# Altium PCB BOARD_2LAYER.PcbDoc (part 4 of 7)
Units mil, origin at the board's own origin, x right, y up, seen from the top; angles counter-clockwise.
Board outline 9842.52 x 9842.52 mil, 2 copper layers (Top Layer, Bottom Layer), stack 34.252 mil thick; 276 components, 129 nets, 793 pads, 303 vias.
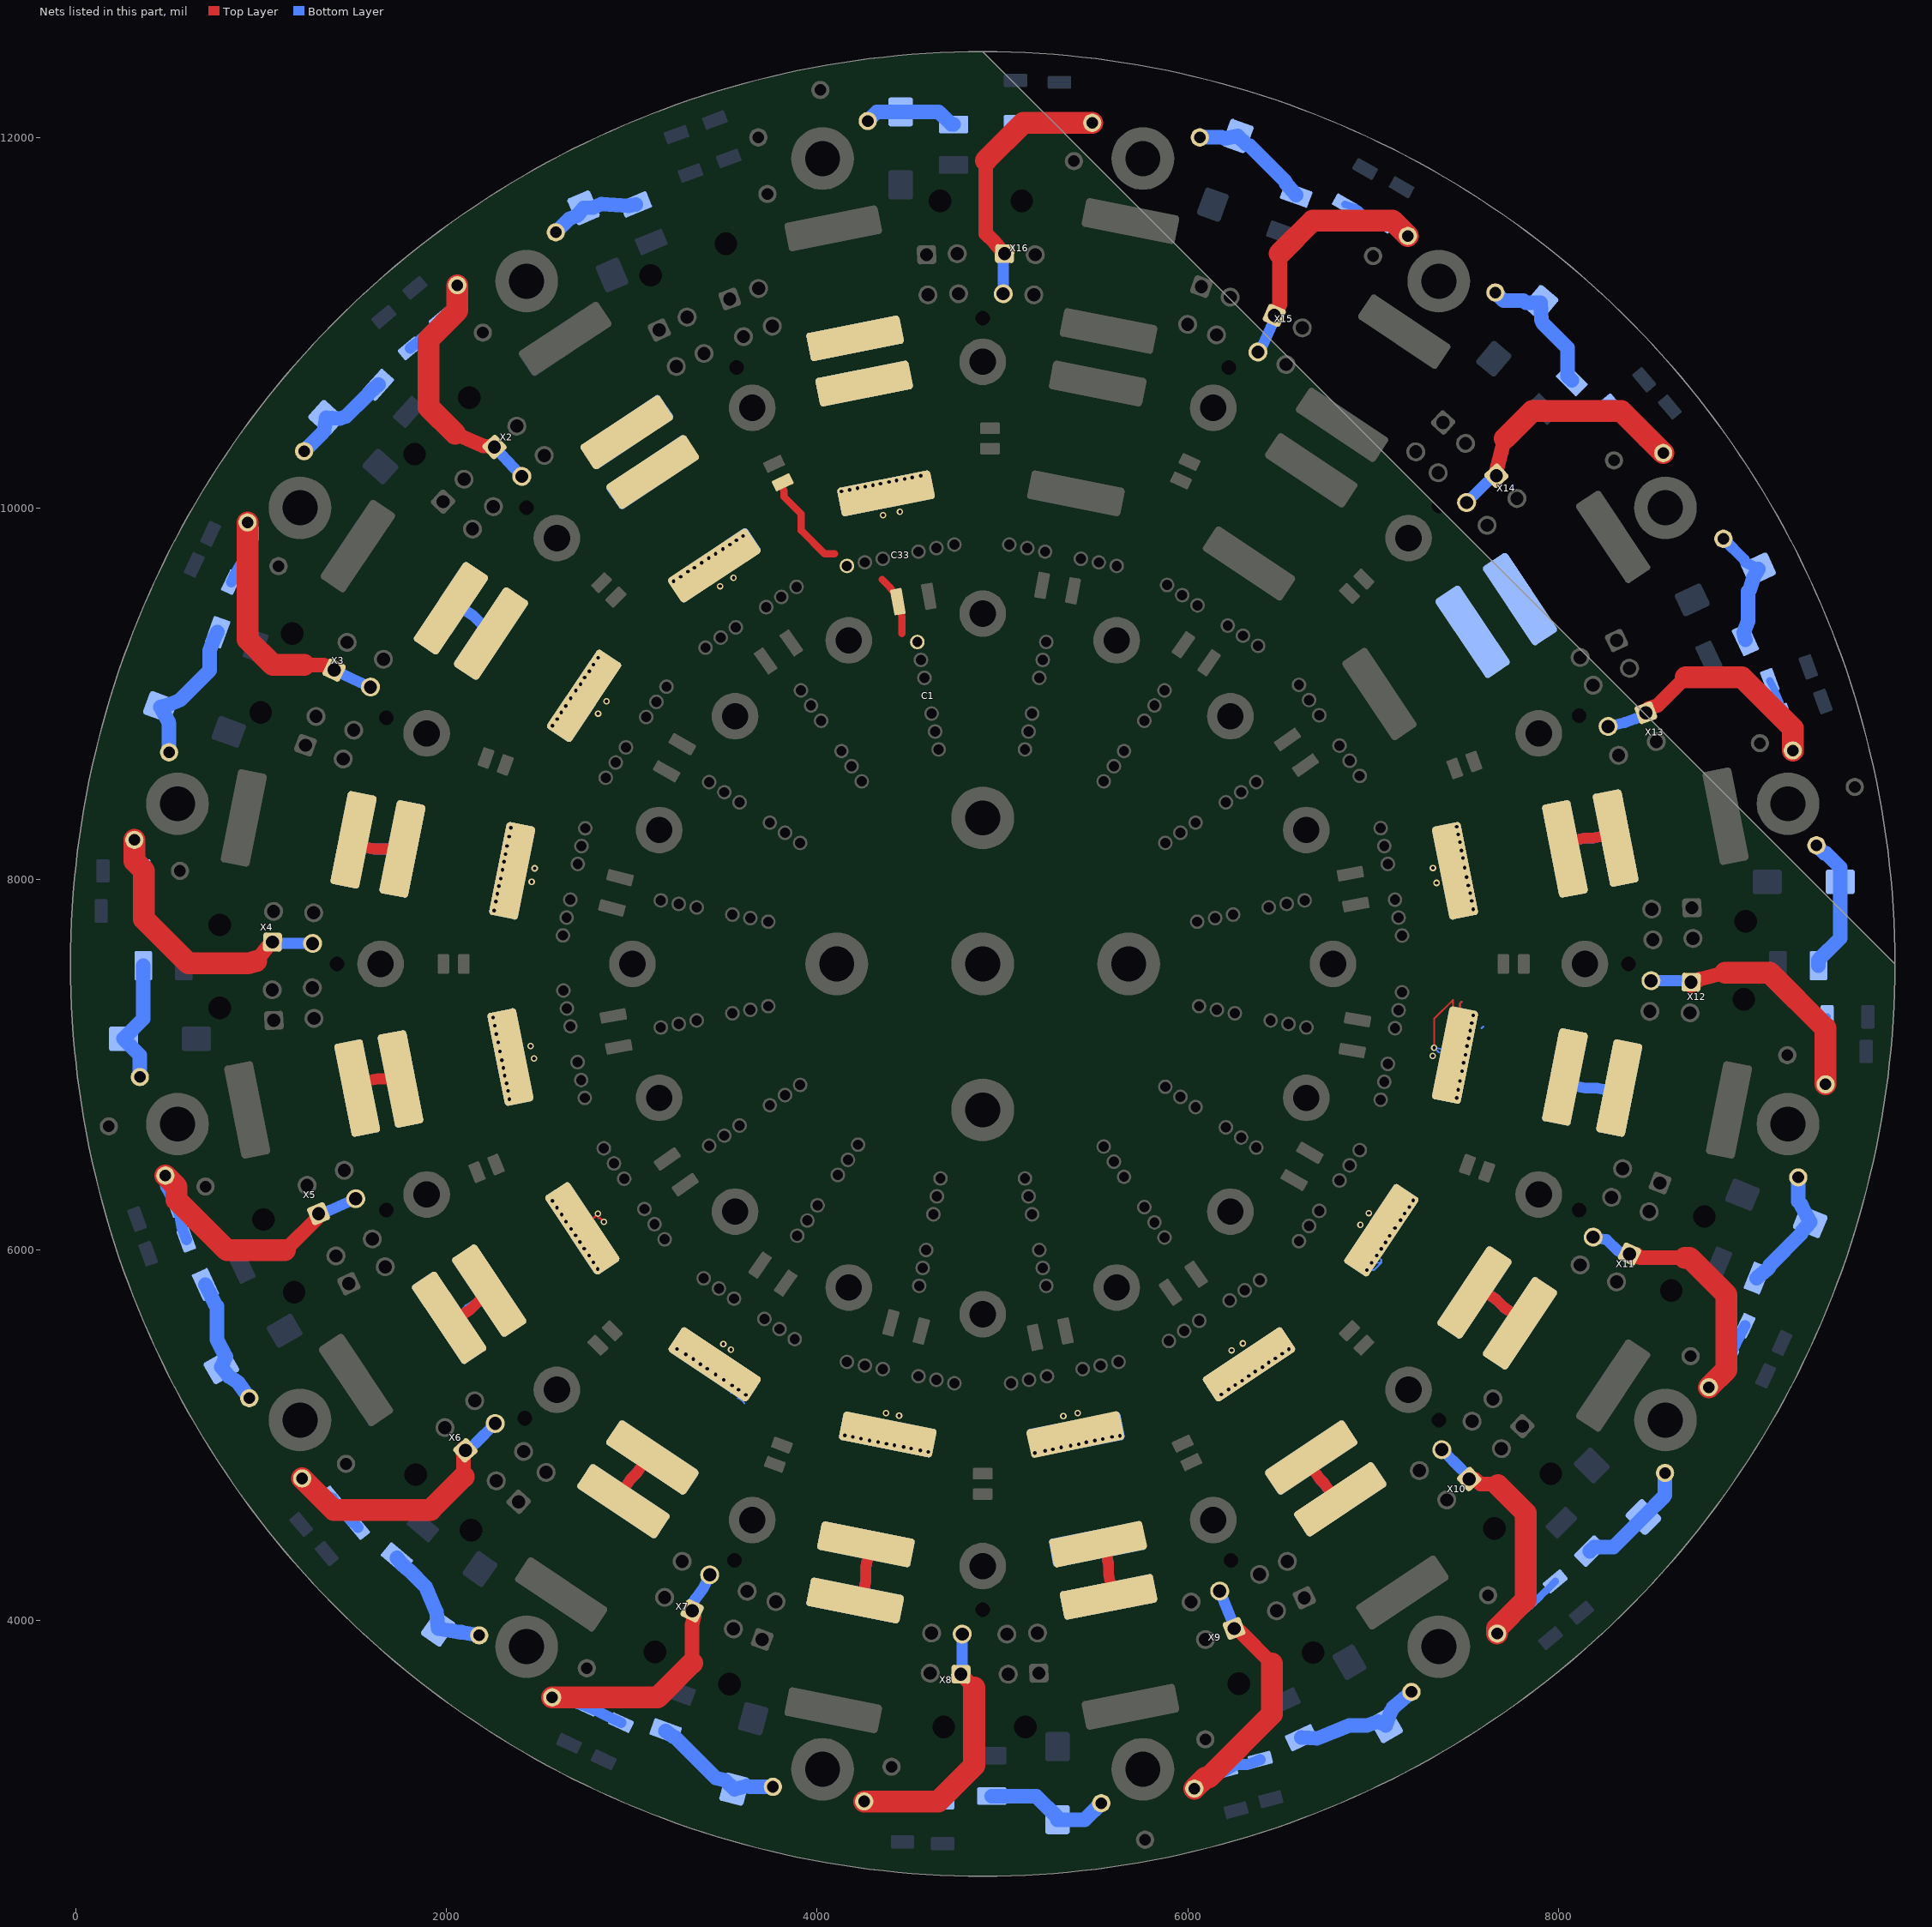
[diagram p4: the nets of this part, all layers, seen from the top]

## Free pads (board coordinates)
  round 338.58 hole 188.98 paste-99999 mask-169.29: ""(548.51,6679.13) ""(548.51,8407.48) ""(1209.93,5082.68) ""(1209.93,10003.94) ""(2432.37,3860.24) ""(2432.37,11226.38) ""(4028.83,3198.82) ""(4028.83,11887.8) ""(4105.6,7543.31) ""(4893,6755.91) ""(4893,7543.31) ""(4893,8330.71) ""(5680.4,7543.31) ""(5757.17,3198.82) ""(5757.17,11887.8) ""(7353.63,3860.24) ""(7353.63,11226.38) ""(8576.07,5082.68) ""(8576.07,10003.94) ""(9237.49,6679.13) ""(9237.49,8407.48)
  round 0 hole 78.74 unplated paste-99999 mask+0: ""(1408.75,7543.31) ""(1674.5,6214.57) ""(1674.5,8872.05) ""(2422.53,5092.52) ""(2432.37,10003.94) ""(3554.42,4324.8) ""(3564.26,10761.81) ""(4893,4059.06) ""(4893,11027.56) ""(6221.74,10761.81) ""(6231.58,4324.8) ""(7353.63,5082.68) ""(7353.63,10013.78) ""(8111.5,6214.57) ""(8111.5,8881.89) ""(8377.25,7543.31)
  round 251.97 hole 141.73 paste-99999 mask+7.87: ""(1644.97,7543.31)
  round 251.97 hole 141.73 paste-99999 mask-125.98: ""(1893,6299.21) ""(1893,8787.4) ""(2595.76,5246.06) ""(2595.76,9840.55) ""(3003.24,7543.31) ""(3146.94,6820.87) ""(3146.94,8265.75) ""(3556.39,6206.69) ""(3556.39,8879.92) ""(3648.91,4543.31) ""(3648.91,10543.31) ""(4170.56,5797.24) ""(4170.56,9289.37) ""(4893,4295.28) ""(4893,5653.54) ""(4893,9433.07) ""(4893,10791.34) ""(5615.44,5797.24) ""(5615.44,9289.37) ""(6137.09,4543.31) ""(6137.09,10543.31) ""(6229.61,6206.69) ""(6229.61,8879.92) ""(6639.06,6820.87) ""(6639.06,8265.75) ""(6782.76,7543.31) ""(7190.24,5246.06) ""(7190.24,9840.55) ""(7893,6299.21) ""(7893,8787.4) ""(8141.03,7543.31)

## Via types
v1: diameter 35.43/35.43 (per signal layer), hole 19.68, Top Layer to Bottom Layer, 303 vias

## Nets (pads, with @x,y where several pads share a name; then routed paths per layer and width w, separated by ;. In a path a pad name is that pad's centre, name@x,y a point inside that pad or via, vN(x,y) a via of type N, cw(c..) or ccw(c..) an arc to the next point about the centre after c; other vN are vias at no path point)
$1N729: L65.1 R1.2 TP18.1 | length 511.1
  Bottom Layer w78.74: TP18.1@4272.92,12090.55 4322.13,12139.76 R1.2@4450.09,12139.76 4655.8,12139.76 4723.71,12071.85 L65.1@4735.52,12071.85
$1N1831: R35.2 R36.2 TP19.1 X2.1 X2.3 | length 1821.7
  Top Layer w78.74: 2047.18,10403.25 2198.54,10337.43 X2.1@2258.7,10331.85
  Top Layer w118.11: 2047.18,10403.25 1903.33,10547.1 1903.33,10911.9 2058.35,11066.93 TP19.1@2058.35,11204.72
  Bottom Layer w59.06: R36.2@1804.41,10864.37 1830.21,10885.62 1863.06,10913.18 1918.01,10968.13 1949.9,10995.87 R35.2@1971.73,11021.85 2039.4,11084.97 2068.2,11115.6 2064.32,11148.32 TP19.1@2058.35,11204.72 ; X2.1@2258.7,10331.85 2364.08,10218.84 X2.3@2406.37,10173.49
$1N1835: L66.1 R2.2 TP20.1 | length 489.2
  Bottom Layer w78.74: TP20.1@2589.85,11490.16 2661.54,11561.85 2705.67,11580.58 R2.2@2739.31,11622.15 2790.22,11623.03 2837.61,11643.15 2981.15,11632.49 L66.1@3020.48,11640.31
$1N1894: R37.2 R38.2 TP21.1 X3.1 X3.3 | length 1744.7
  Top Layer w78.74: 1232.87,9156.45 1337.15,9156.45 1352.57,9149.26 X3.1@1393.79,9128.31
  Top Layer w118.11: TP21.1@926.46,9925.2 926.46,9293.93 1063.95,9156.45 1232.87,9156.45
  Bottom Layer w59.06: R37.2@839.36,9603.02 858.09,9639.53 856.66,9640.95 893.28,9703.71 900.47,9719.12 R38.2@927.95,9770.34 951.89,9823.21 959.08,9838.62 959.08,9892.59 TP21.1@926.46,9925.2 ; X3.1@1393.79,9128.31 1493.68,9080.81 X3.3@1590.04,9036.79
$1N1898: L67.1 R3.2 TP22.1 | length 579.7
  Bottom Layer w78.74: TP22.1@1231.58,10309.06 1327.47,10404.94 1338.85,10417.58 R3.2@1351.04,10489.99 1426.49,10485.58 1458.68,10496.88 1566.32,10604.52 1587.9,10628.49 L67.1@1632.68,10667.59
$1N1957: R39.2 R40.2 TP23.1 X4.1 X4.3 | length 1916.7
  Top Layer w78.74: 972.99,7557.76 1039.08,7640.46 X4.1@1061.44,7661.31
  Top Layer w118.11: TP23.1@316.23,8212.6 316.23,8098.43 367.73,8046.92 367.73,7785.8 607.52,7546.01 928.1,7546.01 972.99,7557.76
  Bottom Layer w59.06: TP23.1@316.23,8212.6 316.23,8124.02 367.41,8072.83 R39.2@367.41,8045.28 367.41,7966.11 357.57,7956.27 R40.2@357.57,7828.74 ; X4.1@1061.44,7661.31 1107.45,7654.35 1124.66,7653.75 X4.3@1277.84,7653.75
$1N1961: L68.1 R4.2 TP24.1 | length 809.9
  Bottom Layer w78.74: TP24.1@503.24,8685.04 503.24,8833.32 499.97,8849.35 R4.2@456.05,8929.53 502.42,8941.94 562.45,8967.09 723.27,9127.91 723.27,9234.36 746.25,9297.52 L68.1@764.75,9332.64
$1N2020: R41.2 R42.2 TP25.1 X5.1 X5.3 | length 1716.5
  Top Layer w78.74: 1129.25,5999.02 1297.86,6167.64 X5.1@1309.81,6195.78
  Top Layer w118.11: TP25.1@483.55,6401.57 543.4,6341.72 543.4,6271.06 815.44,5999.02 1129.25,5999.02
  Bottom Layer w59.06: TP25.1@483.55,6401.57 483.55,6344.73 497.42,6319.54 497.51,6319.29 R42.2@537.93,6242.43 557.58,6191.4 559.72,6194.96 571,6125.82 576.82,6109.84 R41.2@596.98,6055.42 ; X5.1@1309.81,6195.78 1354.73,6207.98 1370.5,6214.35 X5.3@1510.58,6276.89
$1N2024: L69.1 R5.2 TP26.1 | length 681.5
  Bottom Layer w78.74: TP26.1@345.76,6933.07 345.76,7051.18 R5.2@257.17,7139.76 364.46,7247.05 L69.1@364.46,7533.46
$1N2036: R43.2 R44.2 TP27.1 X6.1 X6.3 | length 1814.8
  Top Layer w78.74: 2092.27,4776.85 2092.27,4852.49 2090.67,4898.58 2092.27,4929.11 2102.11,4929.11 X6.1@2102.11,4919.26
  Top Layer w118.11: TP27.1@1221.74,4767.72 1391.09,4598.37 1913.79,4598.37 2092.27,4776.85
  Bottom Layer w59.06: TP27.1@1221.74,4767.72 1295.79,4693.66 1309.68,4693.66 1325.58,4686.76 R43.2@1384.93,4661.41 1416.68,4612.3 1428.81,4597.84 1468.99,4557.66 1480.35,4544.13 R44.2@1522.72,4503.93 ; X6.1@2102.11,4919.26 2141.8,4944.26 2155.25,4956.37 X6.3@2263.03,5064.15
$1N2039: L70.1 R6.2 TP28.1 | length 706.8
  Bottom Layer w78.74: L70.1@699.5,5814.06 732.47,5748.04 751.12,5708.05 761.45,5697.72 761.45,5516.26 809.42,5425.05 R6.2@785.51,5368.11 824.35,5318.97 872.05,5288.64 TP28.1@936.31,5200.79
$1N2051: R45.2 R46.2 TP29.1 X7.1 X7.3 | length 1740.8
  Top Layer w78.74: 3325.36,3772.42 3325.36,3979.5 3335.31,4024.55 X7.1@3325.36,4053.45
  Top Layer w118.11: TP29.1@2570.17,3586.61 3139.55,3586.61 3325.36,3772.42
  Bottom Layer w59.06: TP29.1@2570.17,3586.61 2660.04,3586.61 2683.21,3563.45 2698.62,3556.26 R45.2@2754.55,3538.88 2807.81,3515.78 2823.22,3508.6 2873.73,3482.41 2889.14,3475.22 R46.2@2941.56,3450.3 ; X7.1@3325.36,4053.45 3333.84,4100.74 3341.3,4116.03 3385.76,4176.07 X7.3@3420.28,4248.07
$1N2054: L71.1 R7.2 TP30.1 | length 684
  Bottom Layer w78.74: L71.1@1732.22,4339.54 1757.32,4308.25 1797.31,4273.52 1886.42,4184.41 1945.65,4047.89 R7.2@1955.29,3956.86 2023.97,3946.91 2077.33,3937.17 2081.25,3938.57 TP30.1@2176.46,3921.26
$1N2066: R47.2 R48.2 TP31.1 X8.1 X8.3 | length 1841.4
  Top Layer w78.74: X8.1@4775,3711.75 4846.76,3639.98
  Top Layer w118.11: TP31.1@4253.24,3025.59 4653.78,3025.59 4846.76,3218.58 4846.76,3639.98
  Bottom Layer w59.06: TP31.1@4253.24,3025.59 4384.14,3025.59 4386.11,3027.56 R47.2@4459.93,3027.56 4592.8,3027.56 4602.65,3017.72 R48.2@4676.46,3017.72 ; X8.1@4775,3711.75 4781.95,3757.75 4782.55,3774.97 X8.3@4782.55,3928.15
$1N2069: L72.1 R8.2 TP32.1 | length 703.4
  Bottom Layer w78.74: L72.1@3182.41,3405.21 3223.36,3373.96 3235.11,3369.69 3452.15,3152.64 3501.41,3139.44 R8.2@3552.68,3091.35 3621.49,3108.73 3637.92,3104.33 TP32.1@3761.11,3104.33
$1N2272: R49.2 R50.2 TP33.1 X9.1 X9.3 | length 1757.4
  Top Layer w78.74: X9.1@6249.14,3958.08 6277.07,3945.65 6453.97,3768.74
  Top Layer w118.11: TP33.1@6034.73,3094.49 6094.59,3154.34 6111.34,3154.34 6453.97,3496.98 6453.97,3768.74
  Bottom Layer w59.06: TP33.1@6034.73,3094.49 6098.23,3157.98 6134.25,3157.98 6150.67,3162.39 R49.2@6203.05,3191.13 6255.43,3219.87 6271.86,3224.27 6319.32,3224.27 6335.74,3228.67 R50.2@6390.06,3250.18 ; X9.3@6171.54,4160.23 6229.8,4018.38 6235.9,4002.5 X9.1@6249.14,3958.08
$1N2276: L73.1 R9.2 TP34.1 | length 686.8
  Bottom Layer w78.74: L73.1@4942.21,3054.13 5181.39,3054.13 5296.54,2938.98 R9.2@5296.54,2927.17 5444.18,2927.17 TP34.1@5532.76,3015.75
$1N2288: R51.2 R52.2 TP35.1 X10.1 X10.3 | length 1733.3
  Top Layer w78.74: X10.1@7517.46,4764.61 7548.01,4763.54 7579.1,4736.83 7665.71,4736.83 7669.44,4733.1 7670.77,4733.1 7673.07,4730.8
  Top Layer w118.11: TP35.1@7668.59,3931.1 7668.59,3959.23 7821.64,4112.29 7821.64,4582.23 7673.07,4730.8
  Bottom Layer w39.37: TP35.1@7668.59,3931.1 7759.45,4021.96 7773.08,4033.4 R52.2@7814.27,4074.6 7867.97,4100.88 7881,4111.81 7927.86,4158.67 7941.39,4170.02 R51.2@7981.59,4212.4
  Bottom Layer w59.06: X10.3@7369.78,4922.97 7478.1,4814.65 7489.85,4802.05 X10.1@7517.46,4764.61
$1N2291: L74.1 R10.2 TP36.1 | length 711.2
  Bottom Layer w78.74: L74.1@6612.4,3369.49 6695.91,3364.99 6870.54,3435.82 6965.8,3435.82 7024.7,3456.12 R10.2@7068.2,3435.82 7095.72,3512.09 7107.66,3531.24 TP36.1@7205.99,3616.14
$1N2303: R53.2 R54.2 TP37.1 X11.1 X11.3 | length 1777.3
  Top Layer w78.74: X11.1@8382.36,5977.99 8419.24,5977.99 8439,5958.23 8681.51,5958.23
  Top Layer w118.11: 8681.51,5958.23 8705.76,5958.23 8904.68,5759.31 8904.68,5354.2 TP37.1@8810.32,5259.84
  Bottom Layer w9.84: R54.2@8917.11,5414.7 8907.26,5414.7 R54.2@8942.15,5466.7
  Bottom Layer w39.37: TP37.1@8810.32,5259.84 8874.48,5324 8896.79,5371.84 R54.2@8907.26,5414.7
  Bottom Layer w59.06: X11.3@8186.12,6069.51 8259.22,6055.62 8320.31,5994.53 8335.72,5987.34 X11.1@8382.36,5977.99 ; R54.2@8942.15,5466.7 8971.02,5525.23 8978.21,5540.65 R53.2@9005.69,5591.86
$1N2306: L75.1 R11.2 TP38.1 | length 650.5
  Bottom Layer w78.74: L75.1@8169.07,4375.5 8191.34,4397.77 8295.54,4397.77 R11.2@8457.39,4559.62 8574.1,4676.34 TP38.1@8574.1,4797.24
$1N2318: R55.2 R56.2 TP39.1 X12.1 X12.3 | length 1773.9
  Top Layer w78.74: X12.1@8714.72,7444.99 8714.72,7425.31 8762.01,7461.32 8898.11,7496.25
  Top Layer w118.11: 8898.11,7496.25 9139.06,7496.25 9438.69,7196.61 9438.69,7009.43 9440.24,7007.87 TP39.1@9440.24,6893.7
  Bottom Layer w39.37: TP39.1@9440.24,6893.7 9440.24,7033.46 9438.28,7035.43 R55.2@9438.28,7070.87 9438.28,7159.45 9448.12,7169.29 R56.2@9448.12,7257.87
  Bottom Layer w59.06: X12.3@8498.31,7452.55 8651.49,7452.55 8668.71,7451.95 X12.1@8714.72,7444.99
$1N2321: L76.1 R12.2 TP40.1 | length 679.3
  Bottom Layer w78.74: L76.1@9069.1,5848.84 9133.24,5902.5 9139.9,5918.5 9307.07,6085.67 9313.44,6101.44 R12.2@9357.01,6150.67 9313.55,6231.66 9306.77,6248.29 9292.61,6262.46 TP40.1@9292.61,6391.73
$1N2363: R57.2 R58.2 TP41.1 X13.1 X13.3 | length 1727.1
  Top Layer w78.74: X13.1@8470.4,8898.19 8485.19,8920.75 8534.18,8938.58 8684.75,9089.15
  Top Layer w118.11: 8684.75,9089.15 8989.25,9089.15 9263.08,8815.32 TP41.1@9263.08,8694.88
  Bottom Layer w39.37: R58.2@9139.81,9070.56 9167.06,9018.73 9172.88,9002.75 9194,8954.48 9199.81,8938.49 R57.2@9218.55,8883.56 9237.28,8828.62 9243.09,8812.64 9263.08,8792.65 TP41.1@9263.08,8694.88
  Bottom Layer w59.06: X13.3@8266.92,8824.13 8356.47,8845.75 8414.83,8866 8430.81,8871.82 X13.1@8470.4,8898.19
$1N2366: L77.1 R13.2 TP42.1 | length 756.3
  Bottom Layer w78.74: TP42.1@9391.03,8183.07 9433.49,8140.62 9442.34,8140.62 9518.98,8063.98 R13.2@9518.98,7986.22 9518.98,7682.09 9401.86,7564.96 L77.1@9401.86,7533.46
$1N2368: R59.2 R60.2 TP43.1 X14.1 X14.3 | length 1808.7
  Top Layer w78.74: X14.1@7664.2,10177.19 7665.8,10207.72 7710.18,10377.77
  Top Layer w118.11: 7710.18,10377.77 7858.5,10526.08 8337.39,10526.08 TP43.1@8564.26,10299.21
  Bottom Layer w39.37: R59.2@8292.81,10553.16 8329.87,10508.5 8341.61,10494.51 8376.87,10459.25 8388.23,10445.72 R60.2@8430.6,10405.52 8487.74,10377.71 8498.02,10365.45 TP43.1@8564.26,10299.21
  Bottom Layer w59.06: X14.3@7503.28,10032.3 7611.06,10140.08 7624.51,10152.19 X14.1@7664.2,10177.19
$1N2371: L78.1 R14.2 TP44.1 | length 653.8
  Bottom Layer w59.06: TP44.1@8889.06,9836.61 9000.58,9725.1 9007.76,9709.69 R14.2@9077.31,9673.74
  Bottom Layer w78.74: L78.1@9007.76,9292.23 8998.24,9331.19 9021.5,9392.06 9021.5,9553.19 9030.84,9562.53 9053.3,9632.18 R14.2@9077.31,9673.74
$1N2373: R61.2 R62.2 TP45.1 X15.1 X15.3 | length 1754.1
  Top Layer w78.74: X15.1@6465.84,11041.98 6487.89,11082.76 6494.8,11098.3 6494.8,11374.81
  Top Layer w118.11: 6494.8,11374.81 6673.6,11553.61 7103.17,11553.61 TP45.1@7186.31,11470.47
  Bottom Layer w39.37: R62.2@6845.76,11640.75 6903.11,11624.04 6917.84,11615.54 6958.76,11574.62 6974.6,11574.62 6989.33,11566.11 R61.2@7042.61,11542.33 7095.88,11518.54 7110.61,11510.04 7146.74,11510.04 TP45.1@7186.31,11470.47
  Bottom Layer w59.06: X15.3@6377.76,10844.17 6377.76,10854.91 6404.84,10881.98 6455.58,10995.96 X15.1@6465.84,11041.98
$1N2376: L79.1 R15.2 TP46.1 | length 751.8
  Bottom Layer w78.74: TP46.1@7658.75,11165.35 7703.46,11120.64 7809.68,11120.64 7822.7,11109.7 R15.2@7903.39,11109.46 7906.33,11018.36 7913.12,11001.73 8048.38,10866.47 8048.38,10713.7 L79.1@8070.65,10691.43
$1N2378: R63.2 R64.2 TP47.1 X16.1 X16.3 | length 1836.4
  Top Layer w78.74: 4909.47,11877.76 4909.47,11483.47 4954.85,11438.09 4990.16,11397.22 X16.1@5011,11374.87
  Top Layer w118.11: 4909.47,11877.76 5112.42,12080.71 TP47.1@5483.55,12080.71
  Bottom Layer w39.37: R63.2@5070.17,12088.58 5222.72,12088.58 5232.57,12078.74 R64.2@5306.39,12078.74 5421.54,12078.74 5423.51,12080.71 TP47.1@5483.55,12080.71
  Bottom Layer w59.06: X16.3@5003.44,11158.46 5003.44,11311.64 5004.05,11328.86 X16.1@5011,11374.87
$1N2381: L80.1 R16.2 TP48.1 | length 657.8
  Bottom Layer w78.74: TP48.1@6064.26,12001.97 6182.49,12001.97 6198.48,11996.15 R16.2@6269.38,12009.78 6318.3,11963.01 6334.29,11957.19 6521.67,11769.81 6529.14,11754.91 L80.1@6583.91,11691.25
$1N2769: C1.2 C17.1 C33.2 R17.2 | length 856.7
  Top Layer w39.37: R17.2@3813.93,10140.99 3813.08,10111.32 3820.27,10095.9 3820.27,10064.28 3914.49,9970.06 3914.49,9881.14 4040.32,9755.31 4094.41,9755.31 ; 4349.45,9617.98 4393.68,9573.75 4415.15,9545.43 C17.1@4435.62,9497.11 4451.34,9447.95 4457.61,9412.39 4457.61,9326.44
$1N3213: L1.2 L2.1
$1N3215: L2.2 L3.1 | length 2310.3
  Top Layer w9.84: v1(4131.19,10092.52) 4151.37,10072.34 4159.73,10080.7 4159.73,10085.63 L3.1@4172.53,10098.43 ; v1(4174.5,10100.39) L3.1@4172.53,10098.43 ; v1(4217.8,10110.24) 4217.8,10107.81 L3.1@4244.02,10081.59 ; v1(4259.14,10118.11) 4259.14,10107.81 L3.1@4285.36,10081.59 ; v1(4300.48,10125.98) 4300.48,10107.81 L3.1@4326.7,10081.59 ; v1(4341.82,10133.86) 4341.82,10107.81 L3.1@4368.04,10081.59 ; v1(4428.43,10151.57) 4394.97,10151.57 v1(4387.09,10143.7) 4387.09,10107.81 4371.24,10091.96 L3.1@4371.24,10081.59 ; v1(4471.74,10159.45) L3.1@4471.74,10107.81 ; v1(4513.08,10167.32) L3.1@4535.01,10145.39 ; v1(4558.35,10177.17) 4562.57,10172.95 L3.1@4535.01,10145.39 ; L3.1@4573.06,10049.07 4562.29,10059.83 4562.29,10066.93 4560.32,10068.9 4560.32,10074.8 4378.03,10074.8 L3.1@4371.24,10081.59 ; L3.1@4172.53,10098.43 4189.36,10081.59 L3.1@4244.02,10081.59 ; L3.1@4244.02,10081.59 L3.1@4285.36,10081.59 ; L3.1@4285.36,10081.59 L3.1@4326.7,10081.59 ; L3.1@4316.73,10055.37 4345.02,10055.37 L3.1@4371.24,10081.59 ; L3.1@4316.73,10055.37 4316.73,10033.96 4296.54,10013.78 4276.36,10033.96 4276.36,10055.37 L3.1@4316.73,10055.37 ; L3.1@4326.7,10081.59 L3.1@4368.04,10081.59 ; L3.1@4368.04,10081.59 L3.1@4371.24,10081.59 ; L3.1@4371.24,10081.59 4397.46,10107.81 L3.1@4471.74,10107.81 ; L3.1@4471.74,10107.81 4497.43,10107.81 L3.1@4535.01,10145.39
  Bottom Layer w9.84: v1(4131.19,10092.52) 4151.37,10072.34 4159.73,10080.7 4159.73,10085.63 L2.2@4172.53,10098.43 ; v1(4174.5,10100.39) L2.2@4172.53,10098.43 ; v1(4217.8,10110.24) 4217.8,10107.81 L2.2@4244.02,10081.59 ; v1(4259.14,10118.11) 4259.14,10107.81 L2.2@4285.36,10081.59 ; v1(4300.48,10125.98) 4300.48,10107.81 L2.2@4326.7,10081.59 ; L2.2@4316.73,10055.37 4345.02,10055.37 L2.2@4371.24,10081.59 ; v1(4341.82,10133.86) 4341.82,10107.81 L2.2@4368.04,10081.59 ; v1(4428.43,10151.57) 4394.97,10151.57 v1(4387.09,10143.7) 4387.09,10107.81 4371.24,10091.96 L2.2@4371.24,10081.59 ; v1(4471.74,10159.45) L2.2@4471.74,10107.81 ; v1(4513.08,10167.32) L2.2@4535.01,10145.39 ; v1(4558.35,10177.17) 4562.57,10172.95 L2.2@4535.01,10145.39 ; L2.2@4172.53,10098.43 4189.36,10081.59 L2.2@4244.02,10081.59 ; L2.2@4244.02,10081.59 L2.2@4285.36,10081.59 ; L2.2@4285.36,10081.59 L2.2@4326.7,10081.59 ; L2.2@4326.7,10081.59 L2.2@4368.04,10081.59 ; L2.2@4368.04,10081.59 L2.2@4371.24,10081.59 ; L2.2@4371.24,10081.59 4397.46,10107.81 L2.2@4471.74,10107.81 ; L2.2@4471.74,10107.81 4497.43,10107.81 L2.2@4535.01,10145.39
  other v1: 4355.6,9964.57 4446.15,9982.28
$1N3217: L3.2 L4.1
$1N5209: L5.2 L6.1
$1N5210: L6.2 L7.1 | length 1516.3
  Top Layer w9.84: v1(3225.68,9608.27) 3225.68,9622.75 3263.08,9622.75 v1(3263.08,9631.89) 3284.73,9653.54 L7.1@3300.48,9653.54 ; L7.1@3298.51,9651.57 L7.1@3300.48,9653.54 ; v1(3302.45,9659.45) L7.1@3306.39,9659.45 ; L7.1@3333.94,9677.17 L7.1@3339.85,9677.17 ; v1(3337.88,9681.1) 3347.72,9690.94 L7.1@3353.63,9690.94 ; L7.1@3420.56,9740.16 3414.65,9734.25 v1(3414.65,9732.28) L7.1@3444.5,9762.13 ; v1(3491.42,9781.5) L7.1@3467.8,9781.5 ; v1(3528.83,9805.12) L7.1@3520.21,9805.12 ; v1(3599.69,9852.36) 3564.26,9852.36 v1(3564.26,9828.74) 3544.08,9808.56 3523.64,9808.56 L7.1@3520.21,9805.12 ; L7.1@3300.48,9653.54 L7.1@3306.39,9659.45 ; L7.1@3306.39,9659.45 3320.17,9673.23 3335.91,9673.23 L7.1@3339.85,9677.17 ; L7.1@3339.85,9677.17 L7.1@3353.63,9690.94 ; L7.1@3353.63,9690.94 3369.38,9706.69 v1(3377.25,9706.69) 3401.11,9682.83 3435.15,9682.83 L7.1@3444.5,9692.18 3444.5,9726.22 3463.12,9744.84 v1(3452.05,9755.91) 3450.73,9755.91 L7.1@3444.5,9762.13 ; L7.1@3444.5,9762.13 3448.12,9765.75 3452.05,9765.75 L7.1@3467.8,9781.5 ; L7.1@3467.8,9781.5 3491.42,9805.12 L7.1@3520.21,9805.12
  Bottom Layer w9.84: v1(3225.68,9608.27) 3239.46,9608.27 v1(3263.08,9631.89) 3291.62,9631.89 3291.62,9622.95 3376.01,9622.95 L6.2@3437.04,9683.98 ; v1(3302.45,9659.45) 3330.99,9659.45 3337.88,9666.34 v1(3337.88,9681.1) 3366.42,9681.1 3377.25,9691.93 v1(3377.25,9706.69) 3399.96,9683.98 L6.2@3437.04,9683.98 ; v1(3414.65,9732.28) L6.2@3446.7,9764.33 ; v1(3491.42,9781.5) L6.2@3467.8,9781.5 ; v1(3599.69,9852.36) 3564.26,9852.36 v1(3564.26,9828.74) 3528.83,9828.74 v1(3528.83,9805.12) 3491.42,9805.12 L6.2@3467.8,9781.5 ; L6.2@3437.04,9683.98 L6.2@3446.7,9693.64 3446.7,9730.72 3461.97,9745.99 v1(3452.05,9755.91) 3452.05,9758.98 L6.2@3446.7,9764.33 ; L6.2@3446.7,9764.33 3448.12,9765.75 3452.05,9765.75 L6.2@3467.8,9781.5
  other v1: 3475.68,9580.71 3548.51,9625.98
$1N5211: L7.2 L8.1
$1N5240: L9.2 L10.1 | length 268.5
  Bottom Layer w59.06: L9.2@2024.16,9462.05 2083.64,9462.55 2141.97,9423.57 L10.1@2240.18,9325.35
$1N5241: L10.2 L11.1 | length 826.1
  Top Layer w9.84: v1(2597.72,8864.17) 2626.27,8892.72 v1(2619.38,8899.61) ; v1(2643,8935.04) 2643,8948.82 v1(2670.56,8976.38) ; L11.1@2742.67,8989.61 2742.67,9026.69 2746.42,9030.44 2743.89,9032.97 v1(2723.71,9053.15) 2737,9066.44 2737,9080.22 L11.1@2742.67,9085.89 ; v1(2745.36,9088.58) L11.1@2742.67,9085.89 ; L11.1@2770.95,9136.35 v1(2770.95,9122.05) ; v1(2792.61,9157.48) 2792.61,9139.21 2775.44,9122.05 v1(2770.95,9122.05) ; L11.1@2742.67,9085.89 2742.67,9093.76 v1(2770.95,9122.05)
  Bottom Layer w9.84: v1(2572.13,8828.74) 2595.76,8852.36 2595.76,8864.17 2597.72,8866.14 v1(2597.72,8864.17) ; v1(2619.38,8899.61) 2648.91,8929.13 v1(2643,8935.04) ; v1(2670.56,8976.38) 2681.46,8965.48 2718.54,8965.48 L10.2@2742.67,8989.61 ; v1(2698.12,9017.72) 2726.23,8989.61 L10.2@2742.67,8989.61 ; v1(2745.36,9088.58) L10.2@2742.67,9085.89 ; L10.2@2755.87,9134.42 L10.2@2768.24,9122.05 ; L10.2@2769.09,9157.48 v1(2792.61,9157.48) L10.2@2772.42,9137.3 ; L10.2@2770.95,9136.31 v1(2770.95,9122.05) L10.2@2768.24,9122.05 ; L10.2@2742.67,8989.61 2742.67,9026.69 2746.42,9030.44 v1(2723.71,9053.15) 2737,9066.44 2737,9080.22 L10.2@2742.67,9085.89 ; L10.2@2742.67,9085.89 2742.67,9096.47 L10.2@2768.24,9122.05
  other v1: 2818.2,8893.7 2863.47,8960.63 2818.2,9194.88
$1N5242: L11.2 L12.1
$1N5271: L13.2 L14.1 | length 277.8
  Bottom Layer w59.06: L13.2@1498.41,8212.7 1541.44,8176.97 1610.25,8163.28 L14.1@1761.99,8163.28
$1N5272: L14.2 L15.1 | length 1869.5
  Top Layer w9.84: v1(2267.02,7879.92) 2267.02,7908.46 2276.86,7918.31 L15.1@2276.86,7921.26 ; v1(2274.89,7921.26) L15.1@2276.86,7921.26 ; v1(2292.61,8003.94) 2300.48,8011.81 L15.1@2300.48,8051.18 ; v1(2310.32,8094.49) 2300.48,8084.65 L15.1@2300.48,8051.18 ; v1(2318.2,8135.83) 2328.49,8135.83 2328.49,8071.6 L15.1@2354.71,8045.38 ; v1(2326.07,8179.13) L15.1@2330.01,8179.13 ; L15.1@2331.98,8198.82 2330.01,8196.85 L15.1@2330.01,8179.13 ; v1(2347.72,8277.56) 2347.72,8278.51 L15.1@2348.75,8279.53 ; L15.1@2351.66,8299.21 2348.75,8296.3 L15.1@2348.75,8279.53 ; L15.1@2358.57,8289.35 L15.1@2348.75,8279.53 ; L15.1@2276.86,7921.26 2282.76,7927.17 v1(2282.76,7962.6) 2328.49,7962.6 2354.71,7988.82 L15.1@2354.71,8045.38 ; L15.1@2300.48,8051.18 v1(2302.45,8051.18) 2326.64,8051.18 2332.44,8045.38 L15.1@2354.71,8045.38 ; L15.1@2330.01,8179.13 L15.1@2331.98,8179.13 ; L15.1@2331.98,8179.13 2349.21,8196.36 2349.21,8218.99 v1(2337.88,8230.32) 2337.88,8258.86 2348.75,8269.72 L15.1@2348.75,8279.53 ; L15.1@2331.98,8179.13 2354.61,8179.13 2354.71,8179.03 L15.1@2354.71,8045.38
  Bottom Layer w9.84: v1(2257.17,7830.71) 2285.72,7830.71 2334.93,7879.92 v1(2267.02,7879.92) ; v1(2274.89,7921.26) 2300.48,7895.67 2304.97,7895.67 2354.71,7945.41 L14.2@2354.71,7996.69 ; v1(2282.76,7962.6) L14.2@2282.76,7970.47 ; v1(2292.61,8003.94) L14.2@2290.64,8003.94 ; v1(2302.45,8051.18) 2302.45,8019.19 2290.64,8007.38 L14.2@2290.64,8003.94 ; v1(2310.32,8094.49) L14.2@2315.7,8094.49 ; v1(2318.2,8135.83) L14.2@2328.49,8135.83 ; L14.2@2322.13,8155.51 L14.2@2328.49,8161.87 ; v1(2326.07,8179.13) 2328.49,8179.13 L14.2@2328.49,8161.87 ; v1(2337.88,8230.32) L14.2@2350.05,8230.32 ; v1(2347.72,8277.56) 2349.69,8279.53 L14.2@2353.63,8279.53 ; L14.2@2351.66,8299.21 2353.63,8297.24 L14.2@2353.63,8279.53 ; L14.2@2282.76,7970.47 2328.49,7970.47 L14.2@2354.71,7996.69 ; L14.2@2282.76,7970.47 2282.76,7996.06 L14.2@2290.64,8003.94 ; L14.2@2315.7,8094.49 L14.2@2328.49,8107.28 ; L14.2@2315.7,8094.49 L14.2@2328.49,8094.49 ; L14.2@2328.49,8094.49 2328.49,8072.29 L14.2@2354.71,8046.07 ; L14.2@2328.49,8094.49 L14.2@2328.49,8107.28 ; L14.2@2328.49,8107.28 L14.2@2328.49,8135.83 ; L14.2@2328.49,8135.83 L14.2@2328.49,8161.87 ; L14.2@2350.05,8230.32 L14.2@2353.63,8279.53 ; L14.2@2350.05,8230.32 2354.71,8225.65 L14.2@2354.71,8046.07 ; L14.2@2354.71,7996.69 L14.2@2354.71,8045.38 L14.2@2354.71,8046.07
  other v1: 2459.93,7986.22 2475.68,8059.06
$1N5273: L15.2 L16.1 | length 277.8
  Top Layer w59.06: L16.1@1498.41,8212.7 1541.44,8176.97 1610.25,8163.28 L15.2@1761.99,8163.28
$1N5302: L17.2 L18.1
$1N5303: L18.2 L19.1 | length 903
  Bottom Layer w9.84: v1(2251.27,7253.94) 2279.81,7253.94 2344.87,7188.88 L18.2@2344.87,7041.23 ; v1(2261.11,7210.63) 2268.28,7217.8 L18.2@2309.12,7176.95 ; v1(2268.98,7165.35) 2297.53,7165.35 L18.2@2309.12,7176.95 ; v1(2278.83,7120.08) L18.2@2318.65,7120.08 ; v1(2288.67,7070.87) 2288.67,7041.23 2298.51,7041.23 v1(2298.51,7023.62) 2327.26,7023.62 L18.2@2330.99,7027.35 ; v1(2306.39,6982.28) 2318.65,6982.28 L18.2@2330.99,6994.63 ; v1(2314.26,6940.94) L18.2@2324.1,6940.94 ; v1(2324.1,6899.61) L18.2@2324.1,6940.94 ; v1(2331.98,6858.27) 2339.85,6858.27 v1(2339.85,6812.99) ; L18.2@2309.12,7176.95 2318.65,7167.42 L18.2@2318.65,7120.08 ; L18.2@2318.65,7120.08 2318.65,7067.45 L18.2@2344.87,7041.23 ; L18.2@2324.1,6940.94 L18.2@2330.99,6994.63 ; L18.2@2330.99,6994.63 L18.2@2330.99,7027.35 ; L18.2@2330.99,7027.35 L18.2@2344.87,7041.23
  other v1: 2471.74,7033.46 2454.02,7100.39
$1N5304: L19.2 L20.1 | length 248.3
  Top Layer w59.06: L20.1@1518.1,6873.91 1561.13,6909.65 1629.94,6923.33 L19.2@1752.15,6923.33
$1N5333: L21.2 L22.1 | length 297.6
  Bottom Layer w59.06: L21.2@2014.32,5634.41 2016.6,5634.41 2044.34,5606.67 2069.24,5631.57 2119.65,5681.98 2137.69,5693.25 2195.8,5739.48 2197.95,5740.92 L22.1@2230.34,5780.94
$1N5334: L22.2 L23.1 | length 1392.6
  Top Layer w9.84: v1(2572.13,6265.75) 2572.13,6228.35 v1(2595.76,6228.35) 2621.49,6202.61 L23.1@2621.49,6190.94 ; v1(2621.35,6190.94) L23.1@2621.49,6190.94 ; v1(2816.23,5897.64) 2792.61,5921.26 v1(2792.61,5933.07) 2792.61,5961.61 2783.75,5970.47 v1(2768.98,5970.47) 2768.98,5999.02 2760.13,6007.87 v1(2743.39,6007.87) 2719.77,6031.5 v1(2719.77,6043.31) 2696.15,6066.93 v1(2696.15,6078.74) 2732.82,6115.41 L23.1@2732.82,6116.69 ; v1(2849.69,6151.57) 2829.51,6171.76 2820.41,6171.76 2817.38,6174.79 v1(2817.38,6196.15) 2797.19,6175.97 2786.66,6168.93 L23.1@2732.82,6116.69 ; L23.1@2621.49,6190.94 2621.49,6177.02 v1(2644.97,6153.54) 2670.01,6128.5 2670.01,6116.69 v1(2672.53,6114.17) 2685.39,6127.04 2695.74,6116.69 L23.1@2732.82,6116.69
  Bottom Layer w9.84: v1(2572.13,6265.75) L22.2@2572.13,6228.35 ; v1(2595.76,6228.35) L22.2@2572.13,6228.35 ; v1(2621.35,6190.94) L22.2@2621.35,6174.22 ; v1(2644.97,6153.54) L22.2@2631.56,6140.14 ; v1(2816.23,5897.64) 2792.61,5921.26 v1(2792.61,5933.07) 2792.61,5961.61 2783.75,5970.47 v1(2768.98,5970.47) 2768.98,5999.02 2760.13,6007.87 v1(2743.39,6007.87) 2719.77,6031.5 v1(2719.77,6043.31) 2696.15,6066.93 v1(2696.15,6078.74) 2732.82,6115.41 L22.2@2732.82,6116.69 2695.74,6116.69 2685.39,6127.04 v1(2672.53,6114.17) 2652.34,6134.36 2637.35,6134.36 L22.2@2631.56,6140.14 ; L22.2@2572.13,6228.35 2572.13,6223.43 L22.2@2621.35,6174.22 ; L22.2@2621.35,6174.22 2631.56,6164 L22.2@2631.56,6140.14
$1N5335: L23.2 L24.1 | length 270.4
  Top Layer w59.06: L24.1@2014.32,5634.41 2069.85,5639.81 2128.18,5678.79 2229.2,5779.8 L23.2@2230.34,5780.94
$1N5364: L25.2 L26.1 | length 299.5
  Bottom Layer w59.06: L25.2@2954.57,4644.94 2954.08,4704.42 2993.05,4762.75 3024.92,4794.62 3063.9,4852.95 L26.1@3110.95,4880.65
$1N5365: L26.2 L27.1 | length 2018.6
  Top Layer w9.84: L27.1@3214.7,5487.61 3222.32,5487.61 v1(3243.39,5466.54) L27.1@3243.39,5430.38 ; L27.1@3313.87,5393.31 v1(3331.98,5411.42) 3360.26,5383.13 L27.1@3383.88,5383.13 ; v1(3369.38,5383.86) 3383.16,5383.86 L27.1@3383.88,5383.13 ; v1(3452.05,5328.74) 3458.03,5334.72 L27.1@3458.03,5336.54 ; v1(3576.07,5246.06) 3547.53,5246.06 3547.53,5282.3 L27.1@3547.11,5282.73 ; v1(3615.44,5218.5) 3615.44,5247.05 3627.26,5247.05 3634.79,5239.52 3687.37,5292.1 3687.37,5292.9 3688.55,5294.09 3688.55,5295.29 3689.48,5296.22 3689.48,5297.76 3690.16,5298.44 3690.16,5300.31 3690.55,5300.71 3690.55,5301.37 3690.11,5301.81 3690.11,5303.75 3689.38,5304.48 3689.38,5306.05 3688.38,5307.06 3688.38,5308.25 3687.11,5309.51 3687.11,5310.3 3686.42,5310.99 3686.27,5310.99 3684.82,5312.44 3554.47,5312.44 3483.78,5383.13 L27.1@3446.7,5383.13 ; L27.1@3383.88,5383.13 v1(3406.78,5360.24) 3419.65,5373.1 3436.67,5373.1 L27.1@3446.7,5383.13 ; L27.1@3446.7,5383.13 3446.7,5347.87 L27.1@3458.03,5336.54 ; L27.1@3458.03,5336.54 v1(3495.36,5299.21) 3530.62,5299.21 L27.1@3531.85,5297.98 ; L27.1@3531.85,5297.98 L27.1@3547.11,5282.73 ; L27.1@3531.85,5297.98 3531.85,5278.47 v1(3540.64,5269.69) 3540.64,5276.26 L27.1@3547.11,5282.73
  Bottom Layer w9.84: v1(3243.39,5466.54) 3263.58,5446.35 3270.97,5446.35 L26.2@3290.64,5426.68 ; v1(3290.64,5437.01) L26.2@3290.64,5426.68 ; v1(3369.38,5383.86) 3383.16,5383.86 L26.2@3383.88,5383.13 ; v1(3452.05,5328.74) 3458.03,5334.72 L26.2@3458.03,5336.54 ; 3534.73,5228.35 L26.2@3543.59,5237.2 ; 3572.13,5200.79 3574.1,5200.79 L26.2@3577.05,5203.74 ; v1(3576.07,5246.06) L26.2@3552.45,5246.06 ; 3607.57,5173.23 L26.2@3577.05,5203.74 ; v1(3615.44,5218.5) 3615.44,5247.05 3627.26,5247.05 3634.79,5239.52 3687.37,5292.1 3687.37,5292.9 3688.55,5294.09 3688.55,5295.29 3689.48,5296.22 3689.48,5297.76 3690.16,5298.44 3690.16,5300.31 3690.55,5300.71 3690.55,5301.37 3690.11,5301.81 3690.11,5303.75 3689.38,5304.48 3689.38,5306.05 3688.38,5307.06 3688.38,5308.25 3687.11,5309.51 3687.11,5310.3 3686.42,5310.99 3686.27,5310.99 3684.82,5312.44 3554.47,5312.44 3483.78,5383.13 L26.2@3446.7,5383.13 ; L26.2@3290.64,5426.68 3290.64,5416.9 3303.43,5404.1 3310.75,5411.42 v1(3331.98,5411.42) 3360.26,5383.13 L26.2@3383.88,5383.13 ; L26.2@3383.88,5383.13 v1(3406.78,5360.24) 3419.65,5373.1 3436.67,5373.1 L26.2@3446.7,5383.13 ; L26.2@3446.7,5383.13 3446.7,5347.87 L26.2@3458.03,5336.54 ; L26.2@3458.03,5336.54 v1(3495.36,5299.21) 3511.11,5299.21 v1(3540.64,5269.69) 3540.64,5257.87 L26.2@3552.45,5246.06 ; L26.2@3543.59,5237.2 L26.2@3577.05,5203.74 ; L26.2@3543.59,5237.2 L26.2@3552.45,5246.06
  other v1: 3534.73,5462.6 3493.39,5492.13
$1N5366: L27.2 L28.1 | length 299.5
  Top Layer w59.06: L28.1@2954.57,4644.94 2954.08,4704.42 2993.05,4762.75 3024.92,4794.62 3063.9,4852.95 L27.2@3110.95,4880.65
$1N5395: L29.2 L30.1 | length 327.7
  Bottom Layer w59.06: L29.2@4203.92,4109.35 4249.5,4150.42 4263.18,4219.23 4263.18,4290.63 4276.87,4359.44 L30.1@4263.18,4412.3
$1N5396: L30.2 L31.1 | length 1698.8
  Top Layer w9.84: v1(4148.91,5000) 4153.93,5005.02 L31.1@4163.36,5005.02 ; L31.1@4159.57,4988.34 4163.36,4992.13 L31.1@4163.36,5005.02 ; v1(4235.52,4982.28) L31.1@4235.52,4988.34 ; v1(4282.76,4972.44) L31.1@4282.76,4988.34 ; v1(4328.04,4964.57) L31.1@4328.04,4988.34 ; v1(4373.31,4954.72) L31.1@4381.08,4954.72 ; L31.1@4381.08,5005.02 L31.1@4408.32,5005.02 ; v1(4416.62,4946.85) 4388.96,4946.85 L31.1@4381.08,4954.72 ; v1(4465.83,4937.01) 4465.83,4978.8 L31.1@4439.61,5005.02 ; v1(4507.17,4929.13) L31.1@4532.06,4954.02 ; v1(4556.39,4919.29) L31.1@4561.58,4924.49 ; v1(4599.69,4911.42) 4586.62,4924.49 L31.1@4561.58,4924.49 ; L31.1@4163.36,5005.02 4179.32,5005.02 v1(4192.21,4992.13) 4231.73,4992.13 L31.1@4235.52,4988.34 ; L31.1@4235.52,4988.34 L31.1@4282.76,4988.34 ; L31.1@4282.76,4988.34 L31.1@4328.04,4988.34 ; L31.1@4328.04,4988.34 L31.1@4381.08,4988.34 ; L31.1@4381.08,4954.72 L31.1@4381.08,4988.34 ; L31.1@4381.08,4988.34 4391.64,4988.34 L31.1@4408.32,5005.02 ; L31.1@4408.32,5005.02 L31.1@4439.61,5005.02 ; L31.1@4439.61,5005.02 4481.05,5005.02 L31.1@4532.06,4954.02 ; L31.1@4532.06,4954.02 L31.1@4561.58,4924.49
  Bottom Layer w9.84: v1(4148.91,5000) 4153.93,5005.02 L30.2@4189.23,5005.02 ; L30.2@4186.69,5002.48 L30.2@4189.23,5005.02 ; v1(4192.21,4992.13) L30.2@4192.21,5005.02 ; v1(4235.52,4982.28) L30.2@4235.52,5005.02 ; v1(4282.76,4972.44) 4282.76,4978.8 L30.2@4328.04,4978.8 ; v1(4328.04,4964.57) L30.2@4328.04,4978.8 ; v1(4416.62,4946.85) 4381.19,4946.85 v1(4373.31,4954.72) 4373.31,4978.8 4381.08,4986.57 L30.2@4381.08,5005.02 ; v1(4465.83,4937.01) 4465.83,4978.8 L30.2@4439.61,5005.02 ; L30.2@4500.05,4966.88 L30.2@4507.17,4966.88 ; v1(4507.17,4929.13) L30.2@4507.17,4966.88 ; v1(4556.39,4919.29) L30.2@4561.58,4924.49 ; v1(4599.69,4911.42) 4586.62,4924.49 L30.2@4561.58,4924.49 ; L30.2@4189.23,5005.02 L30.2@4192.21,5005.02 ; L30.2@4192.21,5005.02 L30.2@4235.52,5005.02 ; L30.2@4235.52,5005.02 L30.2@4381.08,5005.02 ; L30.2@4328.04,4978.8 4354.86,4978.8 L30.2@4381.08,5005.02 ; L30.2@4381.08,5005.02 L30.2@4439.61,5005.02 ; L30.2@4439.61,5005.02 4465.83,5005.02 L30.2@4507.17,4978.9 ; L30.2@4507.17,4966.88 L30.2@4507.17,4978.9 ; L30.2@4507.17,4978.9 L30.2@4561.58,4924.49
  other v1: 4442.21,5106.3 4371.35,5120.08
$1N5397: L31.2 L32.1 | length 327.7
  Top Layer w59.06: L32.1@4203.92,4109.35 4249.5,4150.42 4263.18,4219.23 4263.18,4290.63 4276.87,4359.44 L31.2@4263.18,4412.3
$1N5426: L33.2 L34.1 | length 131.5
  Bottom Layer w59.06: L34.1@5512.97,4412.3 5558.55,4371.23 5572.24,4302.42
$1N5427: L34.2 L35.1 | length 2297.5
  Top Layer w9.84: v1(5174.5,4905.51) 5174.5,4934.06 5244.94,5004.49 L35.1@5385.68,5004.49 ; v1(5229.61,4917.32) 5218.97,4927.97 5257.84,4966.85 5270.95,4953.74 v1(5270.95,4925.2) ; v1(5367.41,4944.88) 5375.28,4952.76 v1(5410.72,4952.76) 5410.72,4986.27 L35.1@5392.49,5004.49 ; v1(5452.05,4962.6) 5452.05,4980.43 L35.1@5427.99,5004.49 ; v1(5497.33,4972.44) 5497.33,4980.43 L35.1@5473.27,5004.49 ; v1(5540.64,4980.31) L35.1@5540.64,5004.49 ; v1(5589.85,4992.13) L35.1@5589.85,4998.03 ; v1(5633.16,4998.03) L35.1@5589.85,4998.03 ; L35.1@5336.41,4980.43 5296.04,4980.43 5296.04,4955.22 v1(5316.23,4935.04) 5336.41,4955.22 L35.1@5336.41,4980.43 ; L35.1@5336.41,4980.43 L35.1@5361.62,4980.43 ; L35.1@5361.62,4980.43 L35.1@5385.68,5004.49 ; L35.1@5361.62,4980.43 5368.43,4980.43 L35.1@5392.49,5004.49 ; L35.1@5385.68,5004.49 L35.1@5392.49,5004.49 ; L35.1@5392.49,5004.49 L35.1@5427.99,5004.49 ; L35.1@5427.99,5004.49 L35.1@5473.27,5004.49 ; L35.1@5473.27,5004.49 L35.1@5540.64,5004.49 ; L35.1@5540.64,5004.49 L35.1@5589.85,4998.03
  Bottom Layer w9.84: v1(5174.5,4905.51) 5174.5,4934.06 5245.46,5005.02 L34.2@5386.21,5005.02 ; v1(5229.61,4917.32) 5218.51,4928.43 5257.39,4967.3 5270.95,4953.74 v1(5270.95,4925.2) ; v1(5367.41,4944.88) 5375.28,4952.76 v1(5410.72,4952.76) 5410.72,4989.38 L34.2@5395.07,5005.02 ; v1(5452.05,4962.6) 5452.05,4978.8 L34.2@5425.83,5005.02 ; v1(5497.33,4972.44) 5497.33,4978.8 L34.2@5471.11,5005.02 ; L34.2@5532.76,4968.5 5532.76,4988.19 L34.2@5540.64,4996.06 ; v1(5540.64,4980.31) L34.2@5540.64,4996.06 ; L34.2@5574.1,4978.35 5580.01,4984.25 L34.2@5589.85,4984.25 ; v1(5589.85,4992.13) L34.2@5589.85,4984.25 ; v1(5633.16,4998.03) 5604.61,4998.03 5590.83,4984.25 L34.2@5589.85,4984.25 ; L34.2@5336.41,4978.8 5336.41,4955.22 v1(5316.23,4935.04) 5296.04,4955.22 5296.04,4978.8 L34.2@5336.41,4978.8 ; L34.2@5336.41,4978.8 L34.2@5359.99,4978.8 ; L34.2@5359.99,4978.8 5368.85,4978.8 L34.2@5395.07,5005.02 ; L34.2@5359.99,4978.8 L34.2@5386.21,5005.02 ; L34.2@5386.21,5005.02 L34.2@5395.07,5005.02 ; L34.2@5395.07,5005.02 L34.2@5425.83,5005.02 ; L34.2@5425.83,5005.02 L34.2@5471.11,5005.02 ; L34.2@5471.11,5005.02 L34.2@5544.57,5005.02 ; L34.2@5540.64,4996.06 5544.57,5000 L34.2@5544.57,5005.02 ; L34.2@5544.57,5005.02 5569.08,5005.02 L34.2@5589.85,4984.25
  other v1: 5328.04,5104.33 5404.81,5120.08
$1N5428: L35.2 L36.1 | length 306.2
  Top Layer w59.06: L35.2@5515.56,4412.83 5557.95,4371.42 5572.24,4302.73 5572.24,4250.71 5585.93,4181.9 L36.1@5572.24,4129.04
$1N5457: L37.2 L38.1 | length 287.4
  Bottom Layer w59.06: L38.1@6665.2,4880.65 6670.61,4825.12 6709.58,4766.78 6735.55,4740.82 6774.53,4682.48 L37.2@6821.58,4654.78
$1N5458: L38.2 L39.1 | length 1475.1
  Top Layer w9.84: v1(6180.4,5220.47) L39.1@6219.77,5220.47 ; v1(6402.84,5368.11) 6377.18,5393.77 6340.1,5393.77 L39.1@6329.46,5383.13 ; L39.1@6219.77,5220.47 L39.1@6219.77,5221.35 ; L39.1@6219.77,5220.47 6219.48,5220.91 L39.1@6219.77,5221.35 ; L39.1@6219.77,5221.35 L39.1@6237.86,5248.03 ; L39.1@6219.77,5221.35 v1(6219.77,5248.03) L39.1@6237.86,5248.03 ; L39.1@6237.86,5248.03 L39.1@6329.46,5383.13 ; L39.1@6237.86,5248.03 6255.2,5248.03 v1(6255.2,5271.65) 6292.61,5271.65 v1(6292.61,5295.28) 6302.45,5295.28 v1(6328.04,5320.87) 6316.16,5332.75 6329.46,5346.05 L39.1@6329.46,5383.13
  Bottom Layer w9.84: v1(6180.4,5220.47) L38.2@6219.77,5220.47 ; v1(6363.47,5344.49) 6334.93,5344.49 6333.37,5346.05 L38.2@6329.46,5346.05 ; v1(6402.84,5368.11) 6402.84,5383.13 6413.41,5393.7 v1(6436.31,5393.7) 6436.31,5408.46 6443.2,5415.35 v1(6471.74,5415.35) ; L38.2@6509.14,5431.1 v1(6509.14,5440.94) 6509.14,5454.72 6401.05,5454.72 L38.2@6329.46,5383.13 ; L38.2@6544.57,5454.72 v1(6544.57,5464.57) ; L38.2@6219.77,5220.47 6219.48,5220.91 L38.2@6219.77,5221.35 ; L38.2@6219.77,5220.47 L38.2@6219.77,5221.35 ; L38.2@6219.77,5221.35 v1(6219.77,5248.03) L38.2@6237.86,5248.03 ; L38.2@6219.77,5221.35 L38.2@6237.86,5248.03 ; L38.2@6237.86,5248.03 6255.2,5248.03 v1(6255.2,5271.65) 6292.61,5271.65 v1(6292.61,5295.28) 6317.21,5295.28 6328.04,5306.1 v1(6328.04,5320.87) 6328.04,5344.63 L38.2@6329.46,5346.05 ; L38.2@6237.86,5248.03 L38.2@6329.46,5383.13 ; L38.2@6329.46,5346.05 L38.2@6329.46,5383.13
  other v1: 6235.52,5458.66 6296.54,5496.06
$1N5459: L39.2 L40.1 | length 287.4
  Top Layer w59.06: L39.2@6665.2,4880.65 6670.61,4825.12 6709.58,4766.78 6735.55,4740.82 6774.53,4682.48 L40.1@6821.58,4654.78
$1N5488: L41.2 L42.1 | length 313.4
  Bottom Layer w59.06: L42.1@7545.82,5771.1 7605.29,5771.6 7663.62,5732.62 7705.33,5690.91 7763.67,5651.94 L41.2@7791.36,5604.88
$1N5489: L42.2 L43.1 | length 1530.3
  Top Layer w9.84: v1(6965.83,5891.73) 6992.8,5918.7 L43.1@6992.8,5932.42 ; v1(6991.42,5931.1) 6992.77,5932.45 6998.8,5938.48 6998.8,5950.29 v1(7018.98,5970.47) 7043.33,5994.82 L43.1@7043.33,6018.44 ; v1(7042.61,6005.91) 7042.61,6017.72 L43.1@7043.33,6018.44 ; v1(7087.88,6076.77) 7087.88,6105.31 7083.38,6109.82 L43.1@7046.3,6109.82 ; v1(7117.41,6118.11) 7104.54,6130.98 L43.1@7067.46,6130.98 ; v1(7146.94,6161.42) 7140.96,6167.39 7103.88,6167.39 L43.1@7067.46,6130.98 ; v1(7194.18,6232.28) 7192.21,6232.28 L43.1@7186.31,6238.19 ; v1(7215.83,6267.72) L43.1@7186.31,6238.19 ; L43.1@7043.33,6018.44 v1(7066.23,6041.34) 7046.04,6061.52 7040.57,6067 7043.33,6069.77 L43.1@7043.33,6106.85 L43.1@7046.3,6109.82 ; L43.1@7046.3,6109.82 L43.1@7067.46,6130.98 ; L43.1@7144.06,6195.94 L43.1@7156.78,6208.66 ; L43.1@7144.06,6195.94 7132.42,6195.94 7145.14,6208.66 L43.1@7156.78,6208.66 ; L43.1@7144.06,6195.94 7167.68,6195.94 v1(7168.59,6196.85) L43.1@7156.78,6208.66 ; L43.1@7156.78,6208.66 L43.1@7186.31,6238.19
  Bottom Layer w9.84: v1(6965.83,5891.73) 7003.96,5891.73 7043.33,5931.1 ; v1(6991.42,5931.1) 7043.33,5931.1 ; v1(7042.61,6005.91) 7042.61,6017.72 L42.2@7043.33,6018.44 ; v1(7087.88,6076.77) 7087.88,6105.31 7083.38,6109.82 L42.2@7046.3,6109.82 ; L42.2@7182.37,6202.76 L42.2@7172.53,6212.6 ; v1(7194.18,6232.28) L42.2@7192.21,6232.28 ; L42.2@7207.96,6236.22 7205.99,6234.25 L42.2@7194.18,6234.25 ; v1(7215.83,6267.72) L42.2@7215.83,6255.91 ; L42.2@7233.55,6273.62 L42.2@7215.83,6255.91 ; 7043.33,5931.1 7043.33,5946.12 v1(7018.98,5970.47) 7043.33,5994.82 L42.2@7043.33,6018.44 ; L42.2@7043.33,6018.44 v1(7066.23,6041.34) 7040.57,6067 7043.33,6069.77 L42.2@7043.33,6106.85 L42.2@7046.3,6109.82 ; L42.2@7046.3,6109.82 7067.46,6130.98 7104.54,6130.98 v1(7117.41,6118.11) 7117.41,6131.89 v1(7146.94,6161.42) 7152.84,6161.42 7158.75,6167.32 7149.82,6176.25 7168.59,6195.02 v1(7168.59,6196.85) 7168.59,6208.66 L42.2@7172.53,6212.6 ; L42.2@7172.53,6212.6 L42.2@7192.21,6232.28 ; L42.2@7192.21,6232.28 L42.2@7194.18,6234.25 ; L42.2@7194.18,6234.25 L42.2@7215.83,6255.91
  other v1: 6930.4,6135.83 6975.68,6198.82
$1N5490: L43.2 L44.1 | length 313.4
  Top Layer w59.06: L43.2@7545.82,5771.1 7605.29,5771.6 7663.62,5732.62 7705.33,5690.91 7763.67,5651.94 L44.1@7791.36,5604.88
$1N5519: L45.2 L46.1 | length 317.8
  Bottom Layer w59.06: L46.1@8033.85,6933.18 8074.92,6887.6 8143.73,6873.91 8205.29,6873.91 8274.1,6860.22 L45.2@8326.96,6873.91
$1N5520: L46.2 L47.1 | length 3320.8
  Top Layer w9.84: v1(7328.23,7091.33) 7328.23,7247 7429.11,7347.89 7429.81,7309 L47.1@7431.71,7265.75 ; v1(7450.09,6820.87) 7441.13,6820.87 7441.13,6864.17 v1(7457.96,6864.17) 7467.8,6874.02 v1(7467.8,6911.42) 7467.35,6911.42 L47.1@7467.35,6964.57 ; 7475.68,7338.58 7468.31,7331.21 7468.31,7301.53 7464.42,7297.65 7464.42,7279.72 L47.1@7478.39,7265.75 ; v1(7479.61,6964.57) L47.1@7467.35,6964.57 ; v1(7487.49,7009.84) 7497.33,7019.69 v1(7497.33,7053.15) ; v1(7505.2,7100.39) 7505.2,7061.02 v1(7497.33,7053.15) ; v1(7515.05,7141.73) 7467.35,7141.73 L47.1@7441.13,7115.51 ; v1(7522.92,7183.07) L47.1@7498.04,7207.95 ; v1(7530.8,7224.41) 7522.64,7232.56 L47.1@7498.04,7207.95 ; v1(7538.67,7265.75) L47.1@7478.39,7265.75 ; L47.1@7431.71,7265.75 7461.15,7265.75 L47.1@7469.77,7257.13 ; L47.1@7431.71,7265.75 7431.71,7060.5 L47.1@7441.13,7051.08 ; L47.1@7441.13,7051.08 7467.35,7024.85 L47.1@7467.35,6964.57 ; L47.1@7441.13,7051.08 7443.2,7053.15 v1(7497.33,7053.15) ; L47.1@7441.13,7051.08 L47.1@7441.13,7115.51 ; L47.1@7441.13,7115.51 7441.13,7151.04 L47.1@7498.04,7207.95 ; L47.1@7469.77,7257.13 7469.77,7236.22 L47.1@7498.04,7207.95 ; L47.1@7469.77,7257.13 L47.1@7478.39,7265.75
  Bottom Layer w9.84: v1(7450.09,6820.87) 7441.13,6820.87 7441.13,6864.17 v1(7457.96,6864.17) 7467.8,6874.02 v1(7467.8,6911.42) 7467.35,6911.42 L46.2@7467.35,6964.57 ; 7475.68,7338.58 7468.31,7331.21 7468.31,7301.53 7464.42,7297.65 L46.2@7464.42,7255.78 ; v1(7479.61,6964.57) L46.2@7467.35,6964.57 ; v1(7487.49,7009.84) 7497.33,7019.69 v1(7497.33,7053.15) ; v1(7505.2,7100.39) 7505.2,7061.02 v1(7497.33,7053.15) ; v1(7515.05,7141.73) L46.2@7518.98,7137.8 ; v1(7522.92,7183.07) 7541.71,7183.07 7542.07,7182.7 7529.81,7159.46 L46.2@7518.98,7137.8 ; v1(7538.67,7265.75) 7496.5,7265.75 L46.2@7486.53,7255.78 ; L46.2@7544.44,7212.22 7532.25,7224.41 v1(7530.8,7224.41) 7522.92,7224.41 7491.55,7255.78 L46.2@7486.53,7255.78 ; 7582.81,7197.24 7585.16,7197.24 7593.4,7205.47 ; L46.2@7431.09,7267.72 7431.09,7157.31 L46.2@7436.82,7151.58 ; L46.2@7431.09,7267.72 7431.09,7278.25 7431.39,7278.54 L46.2@7431.85,7267.72 ; L46.2@7431.09,7267.72 L46.2@7431.85,7267.72 ; L46.2@7431.85,7267.72 L46.2@7436.82,7151.58 ; L46.2@7431.85,7267.72 7441.13,7267.72 L46.2@7441.13,7265.75 ; L46.2@7436.82,7151.58 7441.13,7155.89 L46.2@7441.13,7265.75 ; L46.2@7436.82,7151.58 7436.82,7055.38 L46.2@7441.13,7051.08 ; L46.2@7441.13,7051.08 7441.13,7111.57 7467.35,7137.8 L46.2@7518.98,7137.8 ; L46.2@7441.13,7051.08 7443.2,7053.15 v1(7497.33,7053.15) ; L46.2@7441.13,7051.08 7467.35,7024.85 L46.2@7467.35,6964.57 ; L46.2@7441.13,7051.08 7368.55,7064.37 7351.87,7067.69 v1(7328.23,7091.33) 7372.17,7082.59 L46.2@7441.13,7051.08 ; L46.2@7441.13,7265.75 7446.84,7265.75 7456.81,7255.78 L46.2@7464.42,7255.78 ; L46.2@7464.42,7255.78 L46.2@7486.53,7255.78
  other v1: 7320.17,7047.24
$1N5521: L47.2 L48.1
$1N5550: L49.2 L50.1 | length 298.1
  Bottom Layer w59.06: L50.1@8033.85,8163.28 8074.92,8208.86 8143.73,8222.55 8185.6,8222.55 8254.41,8236.23 L49.2@8307.27,8222.55
$1N5551: L50.2 L51.1 | length 1977.2
  Top Layer w9.84: v1(7467.8,8200.79) 7467.35,8200.79 7441.13,8174.57 L51.1@7441.13,8129.29 ; v1(7475.68,8155.51) 7467.35,8155.51 L51.1@7441.13,8129.29 ; v1(7483.55,8114.17) 7467.35,8114.17 L51.1@7441.13,8087.95 ; v1(7503.24,8011.81) 7503.24,8053.15 v1(7493.39,8062.99) 7458.74,8062.99 L51.1@7441.13,8045.38 ; v1(7513.08,7966.54) L51.1@7467.35,7966.54 ; v1(7522.92,7925.2) 7494.38,7925.2 L51.1@7477.86,7908.68 ; v1(7530.8,7883.86) 7516.74,7869.8 L51.1@7477.86,7908.68 ; v1(7538.67,7838.58) 7525.69,7838.58 7441.13,7923.14 L51.1@7441.13,8045.38 ; L51.1@7441.13,8045.38 7467.35,8019.16 L51.1@7467.35,7966.54 ; L51.1@7441.13,8045.38 L51.1@7441.13,8087.95 ; L51.1@7441.13,8087.95 L51.1@7441.13,8129.29 ; L51.1@7467.35,7966.54 7467.35,7919.19 L51.1@7477.86,7908.68
  Bottom Layer w9.84: v1(7450.09,8283.46) 7450.09,8242.13 v1(7457.96,8242.13) ; v1(7467.8,8200.79) 7467.35,8200.79 7441.13,8174.57 L50.2@7441.13,8129.29 ; v1(7475.68,8155.51) 7467.35,8155.51 L50.2@7441.13,8129.29 ; v1(7483.55,8114.17) 7467.35,8114.17 L50.2@7441.13,8087.95 ; v1(7503.24,8011.81) 7503.24,8053.15 v1(7493.39,8062.99) 7458.74,8062.99 L50.2@7441.13,8045.38 ; v1(7513.08,7966.54) L50.2@7467.35,7966.54 ; v1(7522.92,7925.2) 7494.38,7925.2 7486.12,7916.94 L50.2@7477.86,7908.68 ; v1(7530.8,7883.86) 7516.74,7869.8 L50.2@7477.86,7908.68 ; v1(7538.67,7838.58) 7510.13,7838.58 7441.13,7907.58 L50.2@7441.13,8045.38 ; L50.2@7441.13,8045.38 L50.2@7441.13,8087.95 ; L50.2@7441.13,8045.38 7467.35,8019.16 L50.2@7467.35,7966.54 ; L50.2@7441.13,8087.95 L50.2@7441.13,8129.29 ; L50.2@7467.35,7966.54 7467.35,7919.19 L50.2@7477.86,7908.68
  other v1: 7341.82,7980.31 7322.13,8061.02
$1N5552: L51.2 L52.1 | length 298.1
  Top Layer w59.06: L51.2@8033.85,8163.28 8074.92,8208.86 8143.73,8222.55 8185.6,8222.55 8254.41,8236.23 L52.1@8307.27,8222.55
$1N5581: L53.2 L54.1